# Altium PCB PCB2.PcbDoc (part 1 of 2)
Units mil, origin at the board's own origin, x right, y up, seen from the top; angles counter-clockwise.
Board outline 5000.03 x 3685 mil, 2 copper layers (Top Layer, Bottom Layer), stack 13.6 mil thick; 255 components, 133 nets, 710 pads, 295 vias.
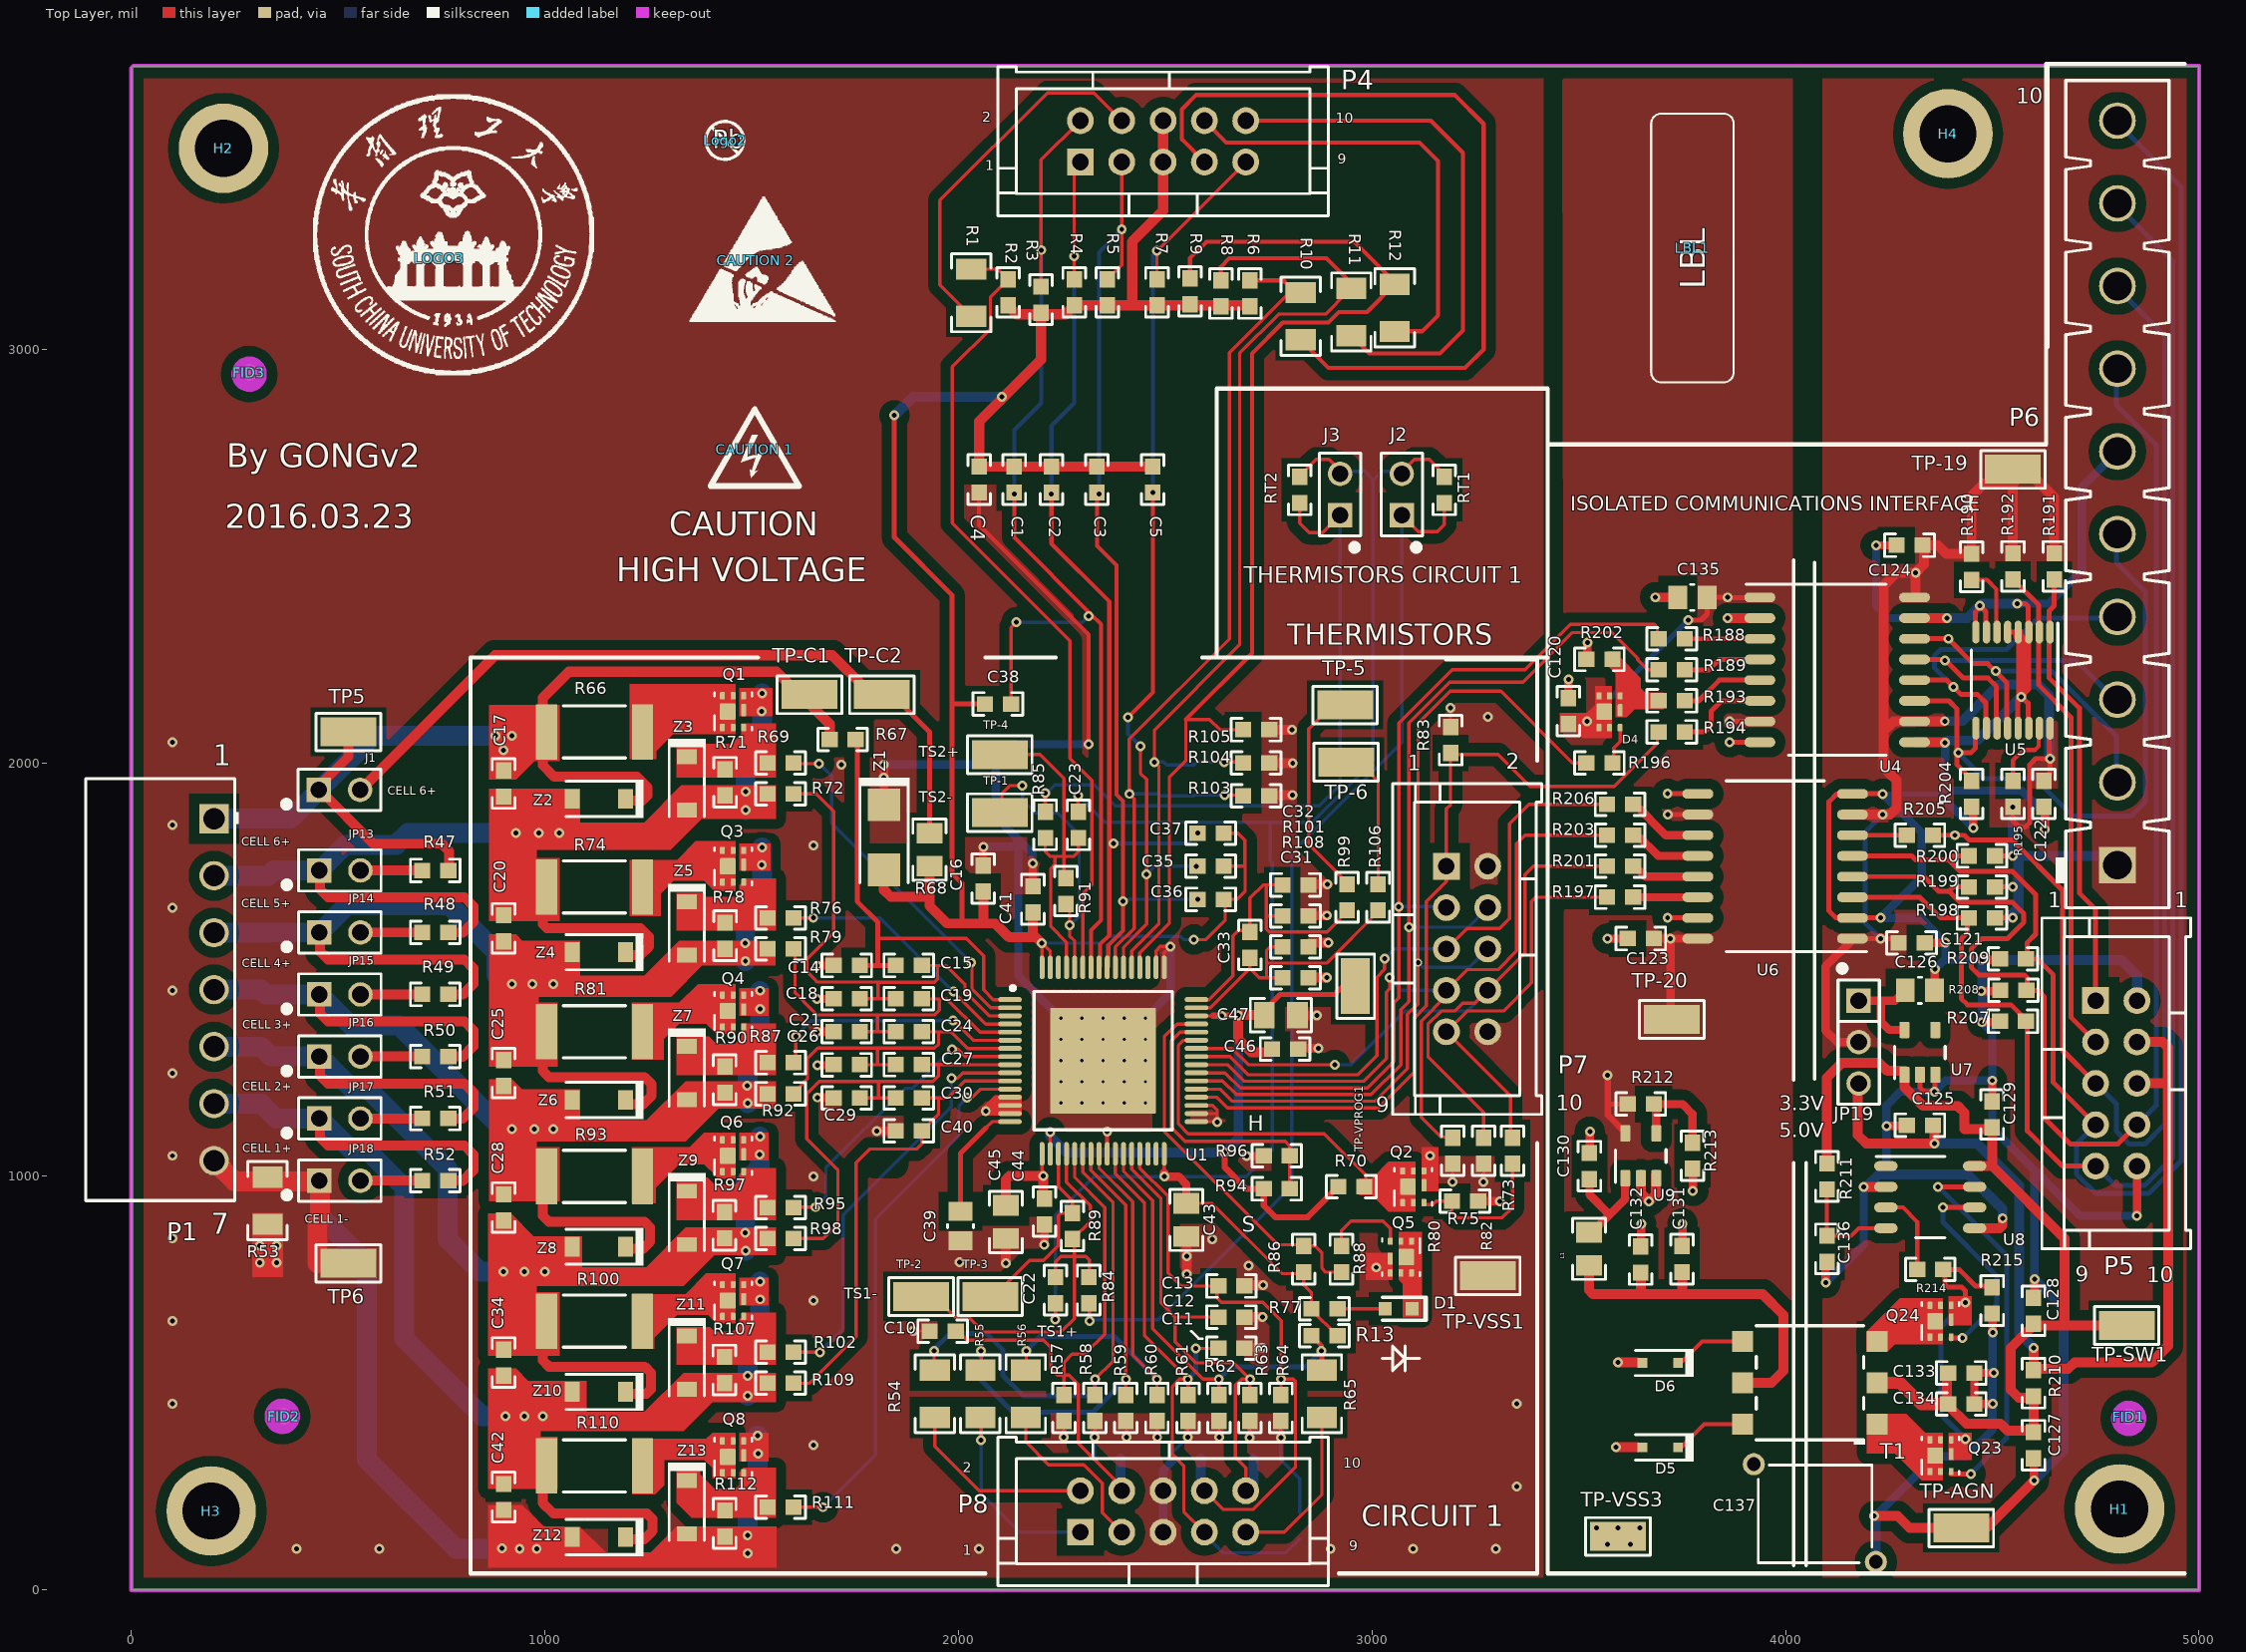
[diagram p0: Top Layer view]
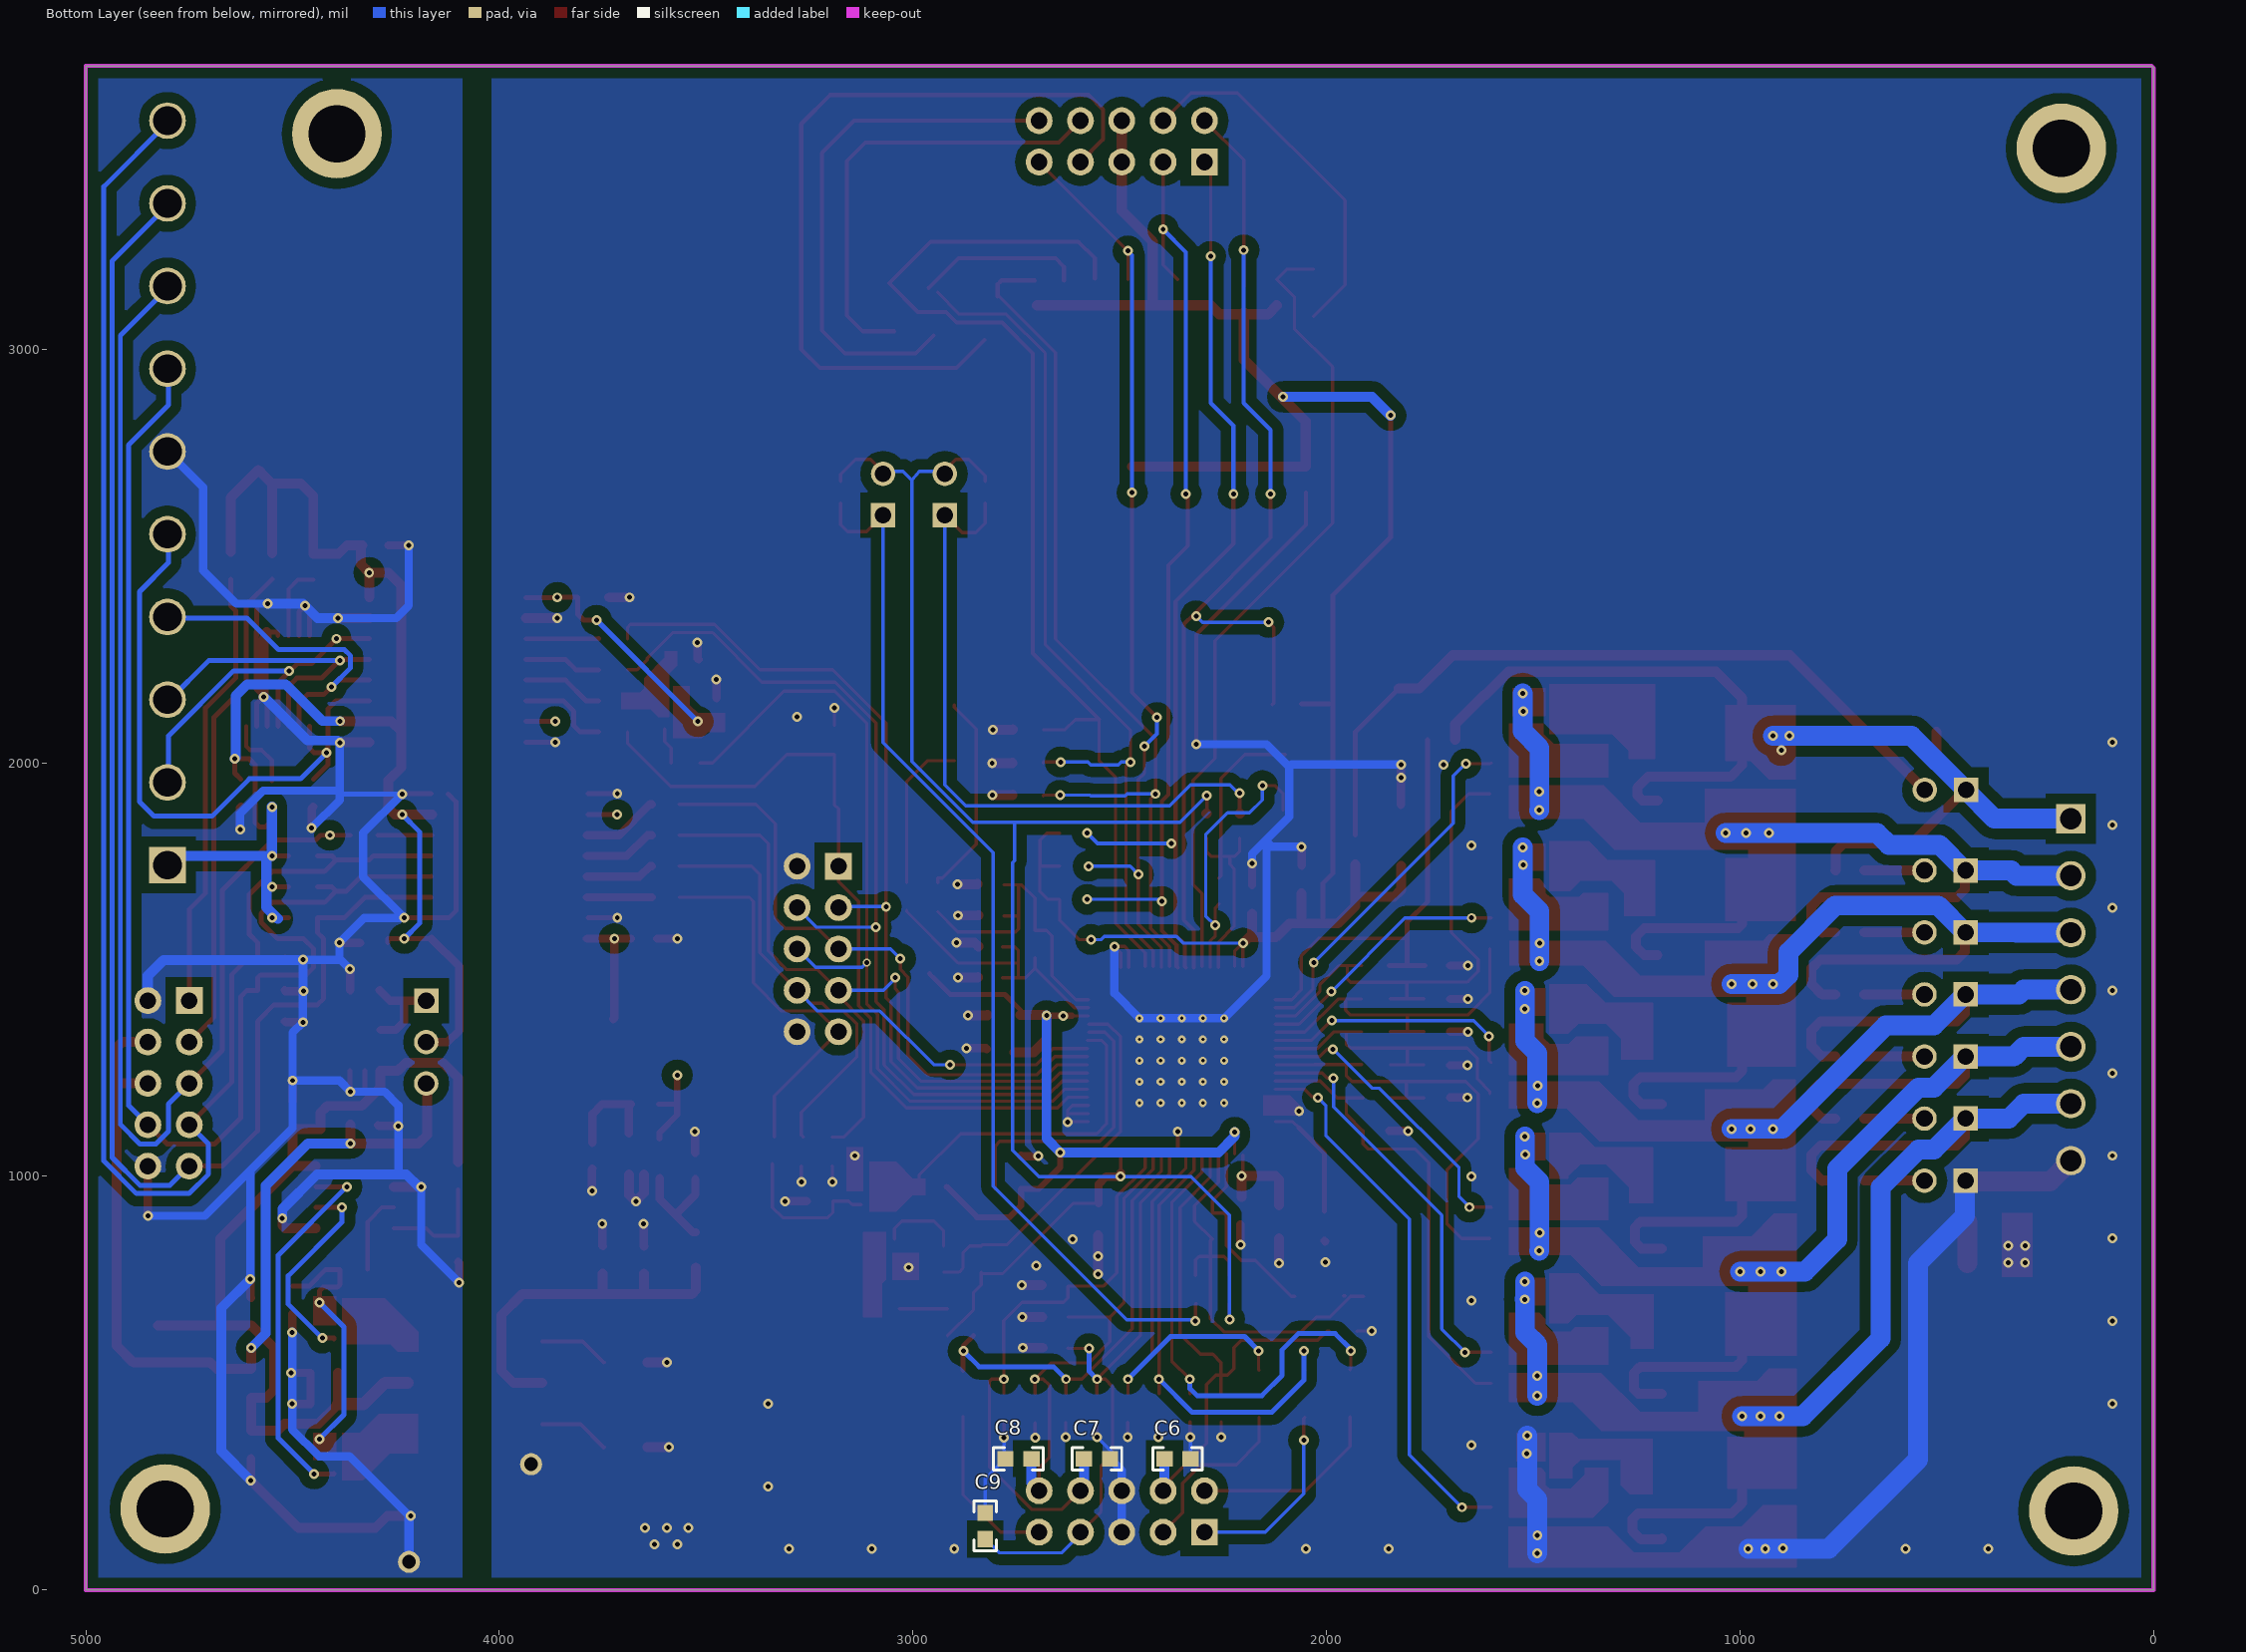
[diagram p1: Bottom Layer view, seen from below]

## Layer stack, top to bottom
Top Layer: signal copper 2.8
Dielectric: core 8, FR-4 High Tg, Dk 4.8
Bottom Layer: signal copper 2.8

## Board outline
0,0 0,3680 5,3685 5000,3685 5000,0.03 5000.03,0

## Design rules (kind name [scope] priority, off if disabled: settings)
Clearance [(InPolygon) vs (IsPad)] p1: gap=10
Clearance Clearance_1 [All] p2: gap=6
ComponentClearance [All] p1: gap=0 collisioncheckmode=3 verticalgap=-393.7 showdistances=FALSE
HoleSize [All] p1: absolutevalues=TRUE maxlimit=150 minlimit=1 maxpercent=80.000 minpercent=20.000
MinimumSolderMaskSliver [All] p1: minsoldermaskwidth=1
PlaneClearance [All] p1: clearance=15
PlaneConnect [All] p1: planeconnectstyle=Direct reliefexpansion=20 reliefentries=4 reliefconductorwidth=10 reliefairgap=10
PolygonConnect PolygonConnect_1 [All] p1: connectstyle=Direct reliefconductorwidth=10 reliefentries=4 polygonreliefangle="90 Angle"
PolygonConnect [All] p2: connectstyle=Direct reliefconductorwidth=10 reliefentries=4 polygonreliefangle="90 Angle"
RoutingVias [All] p1: holewidth=10 width=20 viastyle="Through Hole" minholewidth=5 minwidth=5 maxholewidth=100 maxwidth=100
SilkToSilkClearance [All] p1: silktosilkclearance=0
SilkscreenOverComponentPads [All] p1: minsilkscreentomaskgap=0
SolderMaskExpansion [All] p1: expansion=4
TestPointUsage [All] p1: valid=0 allowmultiple=FALSE
Testpoint [All] p1: side=15 testpointundercomponent=TRUE minsize=40 maxsize=100 preferedsize=60 minholesize=0 maxholesize=40 preferedholesize=32 testpointgrid=1 style=1023 order=0123456789
Width [All] p1: maxlimit=1968.5 minlimit=5 preferedwidth=10
17 further rules are at their usual default settings.

## Classes and differential pairs
component class Sheet5: C120 C121 C122 C123 C124 C125 C126 C127 C128 C129 C130 C131 C132 C133 C134 C135 C136 C137 D4 D5 D6 JP19 L1 Q23 Q24 R188 R189 R190 R191 R192 R193 R194 R195 R196 R197 R198 R199 R200 R201 R202 R203 R204 R205 R206 R207 R208 R209 R210 R211 R212 R213 R214 R215 T1 TP-19 TP-20 TP-AGN TP-SW1 TP-VSS3 U4 U5 U6 U7 U8 U9
component class Sheet2: C6 C7 C8 C9 C14 C15 C16 C17 C18 C19 C20 C21 C22 C23 C24 C25 C26 C27 C28 C29 C30 C31 C32 C33 C34 C35 C36 C37 C38 C39 C40 C41 C42 C43 C44 C45 C46 C47 D1 J1 J2 J3 Q1 Q2 Q3 Q4 Q5 Q6 Q7 Q8 R13 R66 R67 R68 R69 R70 R71 R72 R73 R74 R75 R76 R77 R78 R79 R80 R81 R82 R83 R84 R85 R86 R87 R88 R89 R90 R91 R92 R93 R94 R95 R96 R97 R98 R99 R100 R101 R102 R103 R104 R105 R106 R107 R108 R109 R110 R111 R112 RT1 RT2 TP-1 TP-2 TP-3 TP-4 TP-5 TP-6 TP-C1 TP-C2 TP-VPROG1 TP-VSS1 U1 Z1 Z2 Z3 Z4 Z5 Z6 Z7 Z8 Z9 Z10 Z11 Z12 Z13
component class Sheet_Hardware: "CAUTION 1" "CAUTION 2" FID1 FID2 FID3 H1 H2 H3 H4 LBL1 Logo2 LOGO3 SH-J1 SH-J2 SH-J3 SH-J4 SH-J5 SH-J6 SH-J7 SH-J8 SH-JP1 SH-JP3 SH-JP5 SH-JP7 SH-JP8 SH-JP9 SH-JP10 SH-JP11 SH-JP12 SH-JP19
component class Sheet1: C1 C2 C3 C4 C5 C10 C11 C12 C13 JP13 JP14 JP15 JP16 JP17 JP18 P1 P4 P5 P6 P7 P8 R1 R2 R3 R4 R5 R6 R7 R8 R9 R10 R11 R12 R47 R48 R49 R50 R51 R52 R53 R54 R55 R56 R57 R58 R59 R60 R61 R62 R63 R64 R65 TP5 TP6

## Components (designator, comment, footprint, x,y, rotation, side; value= is the part's Value field where it differs from the comment)
C1 "06035C104KAT2A" 0603[] 2135,2685 r270 top
C2 "06035C104KAT2A" 0603[] 2225,2685 r270 top
C3 "06035C104KAT2A" 0603[] 2335,2685 r270 top
C4 "06035C104KAT2A" 0603[] 2050,2685 r270 top
C5 "06035C104KAT2A" 0603[] 2470,2685 r270 top
C6 "GRM1885C1H330JA01D" 0603[] 2360,317.5 r180 bottom
C7 "GRM1885C1H330JA01D" 0603[] 2555,317.5 r180 bottom
C8 "GRM1885C1H330JA01D" 0603[] 2745,317.5 r0 bottom
C9 "GRM1885C1H330JA01D" 0603[] 2825,155 r90 bottom
C10 "06035C104KAT2A" 0603[] 1962,626 r180 top
C11 "06035C104KAT2A" 0603[] 2660,585 r0 top
C12 "06035C104KAT2A" 0603[] 2660,660 r0 top
C13 "06035C104KAT2A" 0603[] 2660,735 r0 top
C14 "06035C104KAT2A" 0603[] 1730,1510 r180 top
C15 "GRM188R72A104KA35D" 0603[] 1880,1510 r0 top
C16 "GRM188R72A104KA35D" 0603[] 2060,1720 r90 top
C17 "06035C104KAT2A" 0603[] 900,1950 r270 top
C18 "06035C104KAT2A" 0603[] 1730,1430 r180 top
C19 "GRM188R72A104KA35D" 0603[] 1880,1430 r0 top
C20 "06035C104KAT2A" 0603[] 900,1600 r270 top
C21 "06035C104KAT2A" 0603[] 1730,1350 r180 top
C22 "GRM188R71C473KA01D" 0603[] 2235,725 r90 top
C23 "GRM188R71C473KA01D" 0603[] 2290,1850 r270 top
C24 "GRM188R72A104KA35D" 0603[] 1880,1350 r0 top
C25 "06035C104KAT2A" 0603[] 900,1250 r270 top
C26 "06035C104KAT2A" 0603[] 1730,1270 r180 top
C27 "GRM188R72A104KA35D" 0603[] 1880,1270 r0 top
C28 "06035C104KAT2A" 0603[] 900,925 r270 top
C29 "06035C104KAT2A" 0603[] 1730,1190 r180 top
C30 "GRM188R72A104KA35D" 0603[] 1880,1190 r0 top
C31 "C0603C104K4RACTU" 0603[] 2815,1480 r0 top
C32 "C0603C104K4RACTU" 0603[] 2815,1705 r0 top
C33 "C0603C104K4RACTU" 0603[] 2705,1560 r270 top
C34 "GRM188R72A104KA35D" 0603[] 900,550 r270 top
C35 "GRM1885C1H330JA01D" 0603[] 2610,1750 r0 top
C36 "GRM1885C1H330JA01D" 0603[] 2610,1670 r0 top
C37 "GRM1885C1H330JA01D" 0603[] 2610,1830 r0 top
C38 "GRM1885C1H330JA01D" 0603[] 2095.67,2142.55 r180 top
C39 "C2012X7R1A106M125AC" 0805_145 2005,880 r270 top
C40 "06035C104KAT2A" 0603[] 1880,1110 r180 top
C41 "06035C104KAT2A" 0603[] 2180,1670 r90 top
C42 "06035C104KAT2A" 0603[] 900,225 r270 top
C43 "GRM21BR71A225KA01L" 0805_HV 2551,895 r270 top
C44 "06035C104KAT2A" 0603[] 2208,915 r270 top
C45 "GRM21BR71A225KA01L" 0805_HV 2115,890 r270 top
C46 "06035C104KAT2A" 0603[] 2790,1308 r0 top
C47 "GRM21BR71A225KA01L" 0805_HV 2780,1390 r0 top
C120 "06035C104KAT2A" 0603 3475,2125 r90 top
C121 "06035C104KAT2A" 0603 4305,1565 r0 top
C122 "06035C104KAT2A" 0603 4625,1925 r270 top
C123 "06035C104KAT2A" 0603 3650,1575 r180 top
C124 "06035C104KAT2A" 0603 4300,2526 r180 top
C125 "06035C104KAT2A" 0603 4325,1124 r180 top
C126 "C2012X7R1A106M125AC" 0805_145 4325,1450 r0 top
C127 "C1608X7R1C105K" 0603 4600,350 r270 top
C128 "C0603C475K8PACTU" 0603 4600,675 r90 top
C129 "06035C104KAT2A" 0603 4500,1150 r90 top
C130 "C0603C475K8PACTU" 0603 3526,1025 r90 top
C131 "C0603C475K8PACTU" 0603 3750,800 r90 top
C132 "06035C104KAT2A" 0603 3650,799 r90 top
C133 "06035C104KAT2A" 0603 4425,525 r0 top
C134 "C0603C475K8PACTU" 0603 4425,450 r0 top
C135 "C2012X7R1A106M125AC" 0805_145 3775,2400 r180 top
C136 "C0603C151J5GACTU" 0603 4100,825 r270 top
C137 "DEBE33F102ZC3B" CAPRD750W60D700H1000 4071,186 r180 top locked
"CAUTION 1" "DANGER HIGH VOLTAGE" IEC_HIGHVOLTAGE_SMALL 1507.7,2757.7 r0 top
"CAUTION 2" "DANGER HIGH VOLTAGE" jingdian 1510,3215 r0 top
D1 "APT1608SYCK" APT1608_YELLOW 3065,680 r0 top
D4 "CSD25310Q2" TRANS_NEXFET_Q2 3574.53,2123.54 r90 top
D5 "BAT54HT1G" SOD-323 3697,345 r180 top
D6 "BAT54HT1G" SOD-323 3697,549 r180 top
FID1 "Fiducial" Fiducial10-20 4830,415 r90 top
FID2 "Fiducial" FIDUCIAL10-20 365,420 r0 top
FID3 "Fiducial" Fiducial10-20 285,2940 r90 top
H1 "9030" Keystone_9030 4810,205 r0 top
H2 "9030" Keystone_9030 225,3495 r0 top
H3 "9030" Keystone_9030 195,200 r0 top
H4 "9030" Keystone_9030 4395,3530 r0 top
J1 "PEC02SAAN" CONN_PEC02SAAN 503,1935 r0 top
J2 "PEC02SAAN" CONN_PEC02SAAN 3072,2649 r90 top
J3 "PEC02SAAN" CONN_PEC02SAAN 2923,2649 r90 top
JP13 "PEC02SAAN" CONN_PEC02SAAN 504,1740 r0 top
JP14 "PEC02SAAN" CONN_PEC02SAAN 504,1590 r0 top
JP15 "PEC02SAAN" CONN_PEC02SAAN 504,1440 r0 top
JP16 "PEC02SAAN" CONN_PEC02SAAN 504,1290 r0 top
JP17 "PEC02SAAN" CONN_PEC02SAAN 504,1140 r0 top
JP18 "PEC02SAAN" CONN_PEC02SAAN 504,990 r0 top
JP19 "PEC03SAAN" CONN_PEC03SAAN 4177,1325 r270 top
L1 "LB2012T100KR" 0805_HV 3525,825 r90 top
LBL1 "Size: 0.65\" x 0.20 \"" Label_650x200 3775,3245 r90 top
Logo2 "Pb-Free Symbol" Pb-Free_Overlay_Small 1435,3505 r0 top
LOGO3 "SCUTlogo" SCUTlogo 745,3220 r0 top
P1 "395021007" MOLEX_395021007 200,1451.61 r270 top locked
P4 "5103308-1" CONN_5103308-1 2495,3502.75 r0 top
P5 "5103308-1" CONN_5103308-1 4800,1225 r270 top locked
P6 "HPM-10-05-T-S" SAMTEC_HPM-10-05-T-S 4802.59,2652.75 r90 top
P7 "5103308-1" CONN_5103308-1 3230,1550 r270 top locked
P8 "5103308-1" CONN_5103308-1 2495,190 r0 top locked
Q1 "CSD16301Q2" TRANS_NEXFET_Q2 1455,2124 r90 top
Q2 "CSD16301Q2" TRANS_NEXFET_Q2 3100,975 r90 top
Q3 "CSD16301Q2" TRANS_NEXFET_Q2 1455,1750 r90 top
Q4 "CSD16301Q2" TRANS_NEXFET_Q2 1455,1400 r90 top
Q5 "CSD16301Q2" TRANS_NEXFET_Q2 3070,805 r270 top
Q6 "CSD16301Q2" TRANS_NEXFET_Q2 1455,1050 r90 top
Q7 "CSD16301Q2" TRANS_NEXFET_Q2 1455,700 r90 top
Q8 "CSD16301Q2" TRANS_NEXFET_Q2 1455,322 r90 top
Q23 "CSD16301Q2" TRANS_NEXFET_Q2 4375,325 r90 top
Q24 "CSD16301Q2" TRANS_NEXFET_Q2 4375,650 r90 top
R1 "CRCW12061K00FKEA" 1206[] 2031,3136.75 r270 top
R2 "CRCW06030000Z0EA" 0603[] 2120,3137.75 r270 top
R3 "CRCW06030000Z0EA" 0603[] 2200,3120 r270 top
R4 "CRCW06030000Z0EA" 0603[] 2280,3137.75 r270 top
R5 "CRCW06030000Z0EA" 0603[] 2360,3137.75 r270 top
R6 "CRCW06030000Z0EA" 0603[] 2705,3135 r270 top
R7 "CRCW06030000Z0EA" 0603[] 2480,3137.75 r270 top
R8 "CRCW06030000Z0EA" 0603[] 2635,3135 r270 top
R9 "CRCW06030000Z0EA" 0603[] 2560,3140 r270 top
R10 "CRCW12061K00FKEA" 1206[] 2827.91,3080 r270 top
R11 "CRCW12061K00FKEA" 1206[] 2950,3090 r270 top
R12 "CRCW12061K00FKEA" 1206[] 3055,3100 r270 top
R13 "CRCW06030000Z0EA" 0603[] 2885,615 r0 top
R47 "CRCW06031K00JNEA" 0603[] 735,1740 r0 top
R48 "CRCW06031K00JNEA" 0603[] 735,1590 r0 top
R49 "CRCW06031K00JNEA" 0603[] 735,1440 r0 top
R50 "CRCW06031K00JNEA" 0603[] 735,1290 r0 top
R51 "CRCW06031K00JNEA" 0603[] 735,1140 r0 top
R52 "CRCW06031K00JNEA" 0603[] 735,990 r0 top
R53 "CRCW12060000Z0EA" 1206[] 329.46,941.2 r90 top
R54 "CRCW12061K00FKEA" 1206[] 1943,474.49 r90 top
R55 "CRCW12061K00FKEA" 1206[] 2053,474.49 r90 top
R56 "CRCW12061K00FKEA" 1206[] 2163,474.49 r90 top
R57 "CRCW06031K00JNEA" 0603[] 2255,440 r90 top
R58 "CRCW06031K00JNEA" 0603[] 2330,440 r90 top
R59 "CRCW06031K00JNEA" 0603[] 2405,440 r90 top
R60 "CRCW06031K00JNEA" 0603[] 2480,440 r90 top
R61 "CRCW06031K00JNEA" 0603[] 2555,440 r90 top
R62 "CRCW06031K00JNEA" 0603[] 2630,440 r90 top
R63 "CRCW06031K00JNEA" 0603[] 2705,440 r90 top
R64 "CRCW06031K00JNEA" 0603[] 2780,440 r90 top
R65 "CRCW12061K00FKEA" 1206[] 2879,474.49 r90 top
R66 "CRCW251247R0JNEG" 2512 1120,2075 r180 top
R67 "RG1608P-102-B-T5" 0603[] 1720.02,2056.75 r180 top
R68 "CRCW08050000Z0EA" 0805_HV 1930,1790 r270 top
R69 "RG1608P-102-B-T5" 0603[] 1570,2000 r180 top
R70 "ERJ-3EKF1002V" 0603[] 2950,975 r180 top
R71 "CRCW06031M00JNEA" 0603[] 1436,1953 r90 top
R72 "RG1608P-102-B-T5" 0603[] 1570,1925 r0 top
R73 "RG1608P-102-B-T5" 0603[] 3340,1062 r270 top
R74 "CRCW251247R0JNEG" 2512 1120,1700 r180 top
R75 "ERJ-3EKF1002V" 0603[] 3225,940 r180 top
R76 "RG1608P-102-B-T5" 0603[] 1570,1625 r180 top
R77 "CRCW06031K60JNEA" 0603[] 2885,680 r180 top
R78 "CRCW06031M00JNEA" 0603[] 1436,1582 r90 top
R79 "RG1608P-102-B-T5" 0603[] 1570,1550 r0 top
R80 "ERJ-3EKF1002V" 0603[] 3195,1062 r270 top
R81 "CRCW251247R0JNEG" 2512 1120,1350 r180 top
R82 "ERJ-3EKF1002V" 0603[] 3270,1062 r270 top
R83 "ERJ-3EKF1002V" 0603[] 3190,2055 r90 top
R84 "CRCW06031K47FKEA" 0603[] 2315,725 r270 top
R85 "CRCW06031K47FKEA" 0603[] 2210,1850 r90 top
R86 "CRCW0603100KFKEA" 0603[] 2835,800 r270 top
R87 "RG1608P-102-B-T5" 0603[] 1570,1275 r180 top
R88 "CRCW0603100RJNEA" 0603[] 2926,800 r270 top
R89 "CRCW06031K82FKEA" 0603[] 2276,880 r270 top
R90 "CRCW06031M00JNEA" 0603[] 1435,1234 r90 top
R91 "CRCW06031K82FKEA" 0603[] 2260,1690 r90 top
R92 "RG1608P-102-B-T5" 0603[] 1570,1200 r0 top
R93 "CRCW251247R0JNEG" 2512 1120,1000 r180 top
R94 "CRCW06030000Z0EA" 0603[] 2770,970 r180 top
R95 "RG1608P-102-B-T5" 0603[] 1570,925 r180 top
R96 "CRCW06030000Z0EA" 0603[] 2770,1050 r0 top
R97 "CRCW06031M00JNEA" 0603[] 1434,882 r90 top
R98 "RG1608P-102-B-T5" 0603[] 1570,850 r0 top
R99 "CRCW06030000Z0EA" 0603[] 2940,1675 r90 top
R100 "CRCW251247R0JNEG" 2512 1120,650 r180 top
R101 "CRCW06030000Z0EA" 0603[] 2815,1630 r0 top
R102 "RG1608P-102-B-T5" 0603[] 1570,575 r180 top
R103 "CRCW06030000Z0EA" 0603[] 2720,1920 r180 top
R104 "CRCW06030000Z0EA" 0603[] 2720,2000 r180 top
R105 "CRCW06030000Z0EA" 0603[] 2720,2080 r180 top
R106 "CRCW06030000Z0EA" 0603[] 3015,1675 r90 top
R107 "CRCW06031M00JNEA" 0603[] 1434,532 r90 top
R108 "CRCW06030000Z0EA" 0603[] 2815,1555 r0 top
R109 "RG1608P-102-B-T5" 0603[] 1570,500 r0 top
R110 "CRCW251247R0JNEG" 2512 1120,300 r180 top
R111 "RG1608P-102-B-T5" 0603[] 1570,200 r180 top
R112 "CRCW06031M00JNEA" 0603[] 1435,161 r90 top
R188 "CRCW0603100RJNEA" 0603 3725,2300 r0 top
R189 "CRCW0603100RJNEA" 0603 3725,2225 r0 top
R190 "CRCW06031M00JNEA" 0603 4450,2474 r90 top
R191 "CRCW06031M00JNEA" 0603 4650,2475 r90 top
R192 "CRCW06031M00JNEA" 0603 4550,2475 r90 top
R193 "CRCW0603100RJNEA" 0603 3725,2150 r0 top
R194 "CRCW0603100RJNEA" 0603 3725,2075 r0 top
R195 "CRCW06031M00JNEA" 0603 4550,1925 r270 top
R196 "ERJ-3EKF1002V" 0603 3550,2000 r0 top
R197 "CRCW0603100RJNEA" 0603 3600,1675 r180 top
R198 "CRCW06030000Z0EA" 0603 4475,1625 r0 top
R199 "CRCW06030000Z0EA" 0603 4475,1700 r0 top
R200 "CRCW06030000Z0EA" 0603 4475,1775 r0 top
R201 "CRCW0603100RJNEA" 0603 3600,1750 r180 top
R202 "RG1608P-102-B-T5" 0603 3550,2250 r0 top
R203 "CRCW0603100RJNEA" 0603 3600,1825 r180 top
R204 "CRCW0603100KFKEA" 0603 4450,1925 r90 top
R205 "CRCW0603100RJNEA" 0603 4325,1825 r180 top
R206 "CRCW0603100RJNEA" 0603 3600,1900 r180 top
R207 "ERJ-3EKF1002V" 0603 4550,1375 r0 top
R208 "ERJ-3EKF1002V" 0603 4551,1450 r0 top
R209 "ERJ-3EKF1002V" 0603 4550,1526 r0 top
R210 "RC0603FR-072RL" 0603 4600,500 r270 top
R211 "ERJ-3EKF1002V" 0603 4100,1000 r270 top
R212 "RC0603FR-07523KL" 0603 3650,1175 r0 top
R213 "RC0603FR-07169KL" 0603 3775,1050 r90 top
R214 "RG1608P-102-B-T5" 0603 4350,775 r0 top
R215 "CRCW06031R00JNEA" 0603 4500,700 r90 top
RT1 "ERT-J1VG103FA" 0603[] 3175,2660 r90 top
RT2 "ERT-J1VG103FA" 0603[] 2825,2660 r90 top
T1 "Transformer, 400 uH, SMT" COILCRAFT_Q4470-CL 4059,501 r180 top
TP5 "5015" TESTPOINT_KEYSTONE_MINIATURE 525,2075 r0 top
TP6 "5015" TESTPOINT_KEYSTONE_MINIATURE 525,790 r0 top
TP-1 "5015" TESTPOINT_KEYSTONE_MINIATURE 2100,1880 r0 top
TP-2 "5015" TESTPOINT_KEYSTONE_MINIATURE 1910,710 r0 top
TP-3 "5015" TESTPOINT_KEYSTONE_MINIATURE 2077,710 r0 top
TP-4 "5015" TESTPOINT_KEYSTONE_MINIATURE 2100,2020 r0 top
TP-5 "5015" TESTPOINT_KEYSTONE_MINIATURE 2935,2140 r0 top
TP-6 "5015" TESTPOINT_KEYSTONE_MINIATURE 2937.44,2002.02 r0 top
TP-19 "5015" TESTPOINT_KEYSTONE_MINIATURE 4550,2710 r0 top
TP-20 "5020" TESTPOINT_KEYSTONE_MINIATURE 3725,1380 r0 top
TP-AGN "5015" TESTPOINT_KEYSTONE_MINIATURE 4425,150 r0 top
TP-C1 "5015" TESTPOINT_KEYSTONE_MINIATURE 1640,2165 r0 top
TP-C2 "5015" TESTPOINT_KEYSTONE_MINIATURE 1815,2165 r0 top
TP-SW1 "5015" TESTPOINT_KEYSTONE_MINIATURE 4825,640 r0 top
TP-VPROG1 "5015" TESTPOINT_KEYSTONE_MINIATURE 2960,1460 r90 top
TP-VSS1 "5015" TESTPOINT_KEYSTONE_MINIATURE 3280,760 r0 top
TP-VSS3 "5015" TESTPOINT_KEYSTONE_MINIATURE 3595,130 r0 top
U1 "BQ76PL536ATPAPRQ1" PAP0064F_N 2350,1280 r0 top locked
U4 "ISO7241CDW" DW0016A_N 4125,2225 r0 top locked
U5 "PCA9557PWR" PW0016A_N 4550,2200 r270 top locked
U6 "ISO7241CDW" DW0016A_N 3975,1750 r180 top locked
U7 "TPS76933DBVR" DBV0005A_N 4325,1300 r90 top
U8 "UCC2808DTR-2" D0008A_N 4350,950 r0 top
U9 "TPS76901DBV" DBV0005A_N 3650,1050 r90 top
Z1 "SMAJ36CA" SMA 1820,1820 r270 top
Z2 "MMSZ5232B-7-F" SOD-123 1131,1913 r180 top
Z3 "MMSZ5232B-7-F" SOD-123 1343,1950 r270 top
Z4 "MMSZ5232B-7-F" SOD-123 1131,1542 r180 top
Z5 "MMSZ5232B-7-F" SOD-123 1343,1600 r270 top
Z6 "MMSZ5232B-7-F" SOD-123 1131,1185 r180 top
Z7 "MMSZ5232B-7-F" SOD-123 1343,1250 r270 top
Z8 "MMSZ5232B-7-F" SOD-123 1131,830 r180 top
Z9 "MMSZ5232B-7-F" SOD-123 1343,900 r270 top
Z10 "MMSZ5232B-7-F" SOD-123 1131,479 r180 top
Z11 "MMSZ5232B-7-F" SOD-123 1343,550 r270 top
Z12 "MMSZ5232B-7-F" SOD-123 1131,128 r180 top
Z13 "MMSZ5232B-7-F" SOD-123 1343,200 r270 top

## Footprints (in the part's own frame and the unit in brackets; to place one, negate y for a bottom-side part, rotate by r counter-clockwise, add the part's x,y. Pads: shape width x height; smd on the part's side, far side on the other; paste and mask are expansions set on the pad)
0603 [mm] "0603 from SM-752 data"
  rect 1x0.95 smd: 1(-0.8,0) 2(0.8,0)
  silkscreen extent -1.52,-0.69 1.52,0.69, body extent -0.87,-0.47 0.87,0.47, height 0.85
0603[] [mm] "0603 from SM-752 data"
  rect 1x0.95 smd: 1(-0.8,0) 2(0.8,0)
  silkscreen extent -1.52,-0.69 1.52,0.69, body extent -0.87,-0.47 0.87,0.47, height 0.85
0805_145 [mm] "0805 / 1.45mm height"
  rect 1.15x1.45 smd: 1(-0.9,0) 2(0.9,0)
  silkscreen extent -0.1,-0.8 0.1,0.8, body extent -1.1,-0.72 1.1,0.72, height 1.45
0805_HV [mil] "0805 with 30mil clearance between pads"
  rect 50x63 smd: 1(-40,0) 2(40,0)
  silkscreen extent -74,-40 74,40, body extent -43,-29 43,29, height 57
1206[] [mm] "1206 from SM-752 data"
  rect 1.3x1.85 smd: 1(-1.45,0) 2(1.45,0)
  silkscreen extent -2.4,-1.21 2.4,1.21, body extent -1.7,-0.9 1.7,0.9, height 1.35
2512 [mm] "Chip Resistor, Body 6.3x3.2mm, IPC Medium Density"
  rect 1.3x3.4 smd: 1(-2.95,0) 2(2.95,0)
  silkscreen extent -1.9,-1.6 1.9,1.6, body extent -3.22,-1.67 3.22,1.67, height 0.71
APT1608_YELLOW [mm] "SMD, 2-Leads, Body 0.8x1.6mm"
  rect 0.8x0.8 smd: 1(-0.825,0) 2(0.825,0)
  silkscreen extent -1,-0.7 1.8,0.7, body extent -0.8,-0.4 0.81,0.4, height 0.76
CAPRD750W60D700H1000 [mm] "muRata"
  round 1.35 hole 0.85: 1(-3.75,3) 2(3.75,-3)
  silkscreen extent -3.5,-2.95 3.47,3.05, body extent -4.26,-3.51 4.26,3.51, height 9.97
COILCRAFT_Q4470-CL [mm] "SMD, 6-Leads, Body 6.6x6.99mm, Pitch 2.54mm"
  rect 1.27x1.27 smd: 1(-4.13,2.54) 2(-4.13,0) 3(-4.13,-2.54) 4(4.13,-2.54) 5(4.13,0) 6(4.13,2.54)
  silkscreen extent -3.4,-3.5 3.3,3.8, body extent -4.25,-3.49 4.25,3.5, height 5.46
CONN_5103308-1 [mm] "TE Connectivity (AMP) Rev E datasheet"
  rect 1.65x1.65 hole 1.016: 1(-5.08,-1.27)
  round 1.65 hole 1.016: 2(-5.08,1.27) 3(-2.54,-1.27) 4(-2.54,1.27) 5(0,-1.27) 6(0,1.27) 7(2.54,-1.27) 8(2.54,1.27) 9(5.08,-1.27) 10(5.08,1.27)
  silkscreen extent -10.16,-4.57 10.16,4.57, body extent -10.16,-4.57 10.16,4.57, height 9.87
CONN_PEC02SAAN [mm] "SULLINS"
  rect 1.5x1.5 hole 1.016: 1(-1.27,0)
  round 1.5 hole 1.016: 2(1.27,0)
  silkscreen extent -3.45,-1.27 2.54,1.27, body extent -2.54,-1.27 2.54,1.27, height 8.38
CONN_PEC03SAAN [mm] "SULLINS"
  rect 1.5x1.5 hole 1.016: 1(-2.54,0)
  round 1.5 hole 1.016: 2(0,0) 3(2.54,0)
  silkscreen extent -4.72,-1.27 3.81,1.27, body extent -3.84,-1.3 3.84,1.3, height 8.38
D0008A_N [mm] "SOIC, 8-Leads, Body 4.9x3.9mm, Pitch 1.27mm, IPC Medium Density"
  oval 1.45x0.6 smd: 1(-2.725,1.905) 2(-2.725,0.635) 3(-2.725,-0.635) 4(-2.725,-1.905) 5(2.725,-1.905) 6(2.725,-0.635) 7(2.725,0.635) 8(2.725,1.905)
  silkscreen extent -3.3,-2.5 0.9,2.5, body extent -3,-2.45 3,2.45, height 1.63
DBV0005A_N [mm] "SOT23, 5-Leads, Body 2.9x1.6mm, Pitch 0.95mm, Lead Span 2.8mm, IPC Medium Density"
  rrect17% 1x0.6 smd: 1(-1.375,0.95) 2(-1.375,0) 3(-1.375,-0.95) 4(1.375,-0.95) 5(1.375,0.95)
  silkscreen extent -1.63,-1.55 0.38,1.55, body extent -1.42,-1.46 1.42,1.46, height 1.09
DW0016A_N [mm] "SOIC, 16-Leads, Body 10.3x7.5mm, Pitch 1.27mm, IPC Medium Density"
  oval 1.9x0.6 smd: 1(-4.75,4.445) 2(-4.75,3.175) 3(-4.75,1.905) 4(-4.75,0.635) 5(-4.75,-0.635) 6(-4.75,-1.905) 7(-4.75,-3.175) 8(-4.75,-4.445) 9(4.75,-4.445) 10(4.75,-3.175) 11(4.75,-1.905) 12(4.75,-0.635) 13(4.75,0.635) 14(4.75,1.905) 15(4.75,3.175) 16(4.75,4.445)
  silkscreen extent -5.6,-5.25 3,5.25, body extent -5.14,-5.13 5.14,5.13, height 2.54
Fiducial10-20 [mm]
  round 1 smd: 1(0.102,0)
  Top Layer keep-out circle w1.178: c0,0 r0.5
FIDUCIAL10-20 [mm]
  round 1 smd: 1(0.102,0)
  Top Layer keep-out circle w1.178: c0,0 r0.5
IEC_HIGHVOLTAGE_SMALL [mil]
  silkscreen extent -107,-88 107,97
jingdian [mil]
  silkscreen extent -160,-147 194,155
Keystone_9030 [mm] "BRD SPT SNAP LOCK SCREW MNT 3/8\""
  round 5.5 hole 3.5: 1(-0.051,-0.229)
Label_650x200 [mil] "Thermal Transfer Label"
  round 1 on Mech13: 0(0,0)
  silkscreen extent -325,-100 325,100, body extent -326,-101 326,101, height 1
MOLEX_395021007 [mm] "Header(Shrouded), 3.5mm, 7x1,  R/A, TH"
  rect 1.8x1.8 hole 1.3: 1(-10.5,0)
  round 1.8 hole 1.3: 2(-7,0) 3(-3.5,0) 4(0,0) 5(3.5,0) 6(7,0) 7(10.5,0)
  silkscreen extent -12.95,-7.87 12.95,1.52, body extent -12.95,-7.87 12.95,1.27, height 6.86
PAP0064F_N [mm] "Thin QFP, 64-Leads, Body 10x10mm, Pitch 0.5mm, Thermal Pad 6.5x6.5mm, IPC Medium Density"
  rrect100% 1.45x0.3 smd: 1(-5.725,3.75) 2(-5.725,3.25) 3(-5.725,2.75) 4(-5.725,2.25) 5(-5.725,1.75) 6(-5.725,1.25) 7(-5.725,0.75) 8(-5.725,0.25) 9(-5.725,-0.25) 10(-5.725,-0.75) 11(-5.725,-1.25) 12(-5.725,-1.75) 13(-5.725,-2.25) 14(-5.725,-2.75) 15(-5.725,-3.25) 16(-5.725,-3.75) 33(5.725,-3.75) 34(5.725,-3.25) 35(5.725,-2.75) 36(5.725,-2.25) 37(5.725,-1.75) 38(5.725,-1.25) 39(5.725,-0.75) 40(5.725,-0.25) 41(5.725,0.25) 42(5.725,0.75) 43(5.725,1.25) 44(5.725,1.75) 45(5.725,2.25) 46(5.725,2.75) 47(5.725,3.25) 48(5.725,3.75)
  rrect100% 0.3x1.45 smd: 17(-3.75,-5.725) 18(-3.25,-5.725) 19(-2.75,-5.725) 20(-2.25,-5.725) 21(-1.75,-5.725) 22(-1.25,-5.725) 23(-0.75,-5.725) 24(-0.25,-5.725) 25(0.25,-5.725) 26(0.75,-5.725) 27(1.25,-5.725) 28(1.75,-5.725) 29(2.25,-5.725) 30(2.75,-5.725) 31(3.25,-5.725) 32(3.75,-5.725) 49(3.75,5.725) 50(3.25,5.725) 51(2.75,5.725) 52(2.25,5.725) 53(1.75,5.725) 54(1.25,5.725) 55(0.75,5.725) 56(0.25,5.725) 57(-0.25,5.725) 58(-0.75,5.725) 59(-1.25,5.725) 60(-1.75,5.725) 61(-2.25,5.725) 62(-2.75,5.725) 63(-3.25,5.725) 64(-3.75,5.725)
  rrect2% 6.5x6.5 smd: 65(0,0)
  silkscreen extent -5.67,-4.25 4.25,4.57, body extent -6.01,-6.01 6.01,6.01, height 1.2
Pb-Free_Overlay_Small [mil]
  silkscreen extent -46,-46 46,46
PW0016A_N [mm] "TSOP, 16-Leads, Body 5x4.4mm, Pitch 0.65mm, IPC Medium Density"
  oval 1.4x0.45 smd: 1(-2.95,2.275) 2(-2.95,1.625) 3(-2.95,0.975) 4(-2.95,0.325) 5(-2.95,-0.325) 6(-2.95,-0.975) 7(-2.95,-1.625) 8(-2.95,-2.275) 9(2.95,-2.275) 10(2.95,-1.625) 11(2.95,-0.975) 12(2.95,-0.325) 13(2.95,0.325) 14(2.95,0.975) 15(2.95,1.625) 16(2.95,2.275)
  silkscreen extent -3.5,-2.55 1.85,2.75, body extent -3.21,-2.5 3.21,2.5, height 1
SAMTEC_HPM-10-05-T-S [mm] "Header, 5.08mm, 10x1, TH"
  rect 2.25x2.25 hole 1.75: 1(-22.86,0)
  round 2.25 hole 1.75: 2(-17.78,0) 3(-12.7,0) 4(-7.62,0) 5(-2.54,0) 6(2.54,0) 7(7.62,0) 8(12.7,0) 9(17.78,0) 10(22.86,0)
  silkscreen extent -25.47,-3.17 25.33,3.8, body extent -25.47,-3.17 25.33,3.18, height 7.15
SCUTlogo [mil]
  silkscreen extent -305,-281 373,396
SMA [mm] "Molded Diode, 2-Leads, Body 4.3x2.6mm, IPC Medium Density, based on OnSemi component dimensions and land pattern"
  rect 2x2 smd: 1(-2,0) 2(2,0)
  silkscreen extent -3.66,-1.57 2.79,1.57, body extent -2.6,-1.3 2.6,1.3, height 2.42
SOD-123 [mm] "On Semi recommended land pattern"
  rect 0.915x1.22 smd: 1(-1.637,0) 2(1.637,0)
  silkscreen extent -2.74,-1.17 2.03,1.17, body extent -1.93,-0.9 1.93,0.9, height 1.35
SOD-323 [mm] "NXP recommended land pattern"
  rect 0.6x0.6 smd: 1(-1.1,0) 2(1.1,0)
  silkscreen extent -2.06,-0.86 1.53,0.86, body extent -1.3,-0.67 1.3,0.68, height 1.1
TESTPOINT_KEYSTONE_MINIATURE [mil] "Miniature SMT test point"
  rect 135x70 smd: 1(0,0)
  silkscreen extent -78,-46 78,45, body extent -52,-20 52,20, height 61
TRANS_NEXFET_Q2 [mm] "TI recommended land pattern M0167-01"
  rrect33% 0.45x0.3 smd: 1(-0.975,0.65) 2(-0.975,0) 3(-0.975,-0.65) 4(0.975,-0.65) 5(0.975,0) 6(0.975,0.65)
  rrect33% 0.75x0.3 smd: 7(0.095,-0.65)
  rrect11% 1x0.95 smd: 8(0,0.325)
  body extent -1,-1 1,1, height 0.85

## Part data
C1 C2 C3 C4 C5 C10 C11 C12 C13 C120 C121 C122 C123 C124 C125 C129 C132 C133: "CAP, CERM, 0.1 µF, 50 V, +/- 10%, X7R, 0603"
C6 C7 C8 C9 C35 C36 C37 C38: "CAP, CERM, 33 pF, 50 V, +/- 5%, C0G/NP0, 0603"
C14 C17 C18 C20 C21 C25 C26 C28 C29 C40 C41 C42 C44 C46: "CAP, CERM, 0.1uf, 50 V, +/- 10%, X7R, 0603"
C15 C16 C19 C24 C27 C30 C34: "CAP, CERM, 0.1uf, 100 V, +/- 10%, X7R, 0603"
C22 C23: "CAP, CERM, 0.047 µF, 16 V, +/- 10%, X7R, 0603"
C31 C32 C33: "CAP, CERM, 0.1 µF, 16 V, +/- 10%, X7R, 0603"
C39 C126 C135: "CAP, CERM, 10 µF, 10 V, +/- 20%, X7R, 0805"
C43 C45 C47: "CAP, CERM, 2.2 µF, 10 V, +/- 10%, X7R, 0805"
C127: "CAP, CERM, 1 µF, 16 V, +/- 10%, X7R, 0603"
C128 C130 C131 C134: "CAP, CERM, 4.7 µF, 10 V, +/- 10%, X5R, 0603"
C136: "CAP, CERM, 150 pF, 50 V, +/- 5%, C0G/NP0, 0603"
C137: "CAP, CERM, 1000 pF, 3150 V, +80/-20%, E, Radial Disc D7x6mm"
"CAUTION 1" "CAUTION 2": library part IEC_HighVoltage, "IEC 61010-1 High Voltage Warning"
D1: "LED, Yellow, SMD"
D4: "MOSFET, P-CH, -20 V, -20 A, SON 2x2mm"
D5 D6: "Diode, Schottky, 30 V, 0.2 A, SOD-323"
FID1 FID2 FID3: "Fiducial mark.  There is nothing to buy or mount."
H1 H2 H3 H4: "BRD SPT SNAP LOCK SCREW MNT 3/8\""
J1 J2 J3 JP13 JP14 JP15 JP16 JP17 JP18: "Header, 100mil, 2x1, Tin, TH"
JP19: "Header, 100mil, 3x1, Tin, TH"
L1: "Inductor, Wirewound, Ferrite, 10uH, 0.12A, 0.5 ohm, SMD"
LBL1: library part THT-14-423-10, "Thermal Transfer Printable Labels, 0.650\" W x 0.200\" H - 10,000 per roll"
Logo2: library part Pb-Free
P1: "Header(Shrouded), 3.5mm, 7x1,  R/A, TH"
P4 P5 P7 P8: "Header (shrouded), 100mil, 5x2, Gold, TH"
P6: "Header, 5.08mm, 10x1, Tin, TH"
Q1 Q2 Q3 Q4 Q5 Q6 Q7 Q8 Q23 Q24: "MOSFET, N-CH, 25 V, 5 A, SON 2x2mm"
R1 R10 R11 R12 R54 R55 R56 R65: library part CRCW06031K00JNEA, "RES, 1.00 k, 1%, 0.25 W, 1206"
R2 R3 R4 R5 R6 R7 R8 R9 R13 R94 R96 R99 R101 R103 R104 R105 R106 R108 R198 R199 R200: "RES, 0, 5%, 0.1 W, 0603"
R47 R48 R49 R50 R51 R52 R57 R58 R59 R60 R61 R62 R63 R64: "RES, 1.0 k, 5%, 0.1 W, 0603"
R53: "RES, 0, 5%, 0.25 W, 1206"
R66 R74 R81 R93 R100 R110: "RES, 47, 5%, 1 W, 2512"
R67 R69 R72 R73 R76 R79 R87 R92 R95 R98 R102 R109 R111 R202 R214: "RES, 1.00 k, 0.1%, 0.1 W, 0603"
R68: "RES, 0, 5%, 0.125 W, 0805"
R70 R75 R80 R82 R83 R196 R207 R208 R209 R211: "RES, 10.0 k, 1%, 0.1 W, 0603"
R71 R78 R90 R97 R107 R112 R190 R191 R192 R195: "RES, 1.0 M, 5%, 0.1 W, 0603"
R77: "RES, 1.6 k, 5%, 0.1 W, 0603"
R84 R85: "RES, 1.47 k, 1%, 0.1 W, 0603"
R86 R204: "RES, 100 k, 1%, 0.1 W, 0603"
R88 R188 R189 R193 R194 R197 R201 R203 R205 R206: "RES, 100, 5%, 0.1 W, 0603"
R89 R91: "RES, 1.82 k, 1%, 0.1 W, 0603"
R210: "RES, 2.00, 1%, 0.1 W, 0603"
R212: "RES, 523 k, 1%, 0.1 W, 0603"
R213: "RES, 169 k, 1%, 0.1 W, 0603"
R215: "RES, 1.0, 5%, 0.1 W, 0603"
RT1 RT2: "Thermistor NTC, 10.0k ohm, 1%, 0603"
T1: library part Q4470-CLB
TP5 TP6 TP-1 TP-2 TP-3 TP-4 TP-5 TP-6 TP-19 TP-AGN TP-C1 TP-C2 TP-SW1 TP-VPROG1 TP-VSS1 TP-VSS3: "Test Point, Miniature, SMT"
TP-20: "LOW PROFILE, TH"
U1: library part BQ76PL536APAPR, "Lithium-Ion Battery Monitor and Secondary Protection IC for Electric and Hybrid, -40 to 85 degC, 64-pin HTQFP (PAP), Green (RoHS & no Sb/Br)"
U4 U6: "25 Mbps Quad Channels, 3 / 1, Digital Isolator, 3.3 V / 5 V, -40 to +125 degC, 16-pin SOIC (DW), Green (RoHS & no Sb/Br)"
U5: "Remote 8-Bit I2C and SMBus Low-Power I/O Expander with Reset and Configuration Registers, 2.3 to 5.5 V, -40 to 85 degC, 16-pin TSSOP (PW), Green (RoHS & no Sb/Br)"
U7: "Single Output LDO, 100 mA, Fixed 3.3 V Output, 2.7 to 10 V Input, with Low IQ, 5-pin SOT-23 (DBV), -40 to 125 degC, Green (RoHS & no Sb/Br)"
U8: "LOW POWER CURRENT MODE PUSH-PULL PWM, D0008A"
U9: "Ultralow-Power 100-mA Low-Dropout Linear Regulators, DBV0005A"
Z1: "Diode, TVS, Bi, 36 V, 400 W, SMA"
Z2 Z3 Z4 Z5 Z6 Z7 Z8 Z9 Z10 Z11 Z12 Z13: "Diode, Zener, 5.6 V, 500 mW, SOD-123"

## Via types
v1: diameter 24, hole 12, Top Layer to Bottom Layer, tented both sides, 269 vias
v2: diameter 19.68, hole 7.87, Top Layer to Bottom Layer, 25 vias
v3: diameter 20, hole 12, Top Layer to Bottom Layer, tented both sides, 1 vias

## Nets (pads, with @x,y where several pads share a name; then routed paths per layer and width w, separated by ;. In a path a pad name is that pad's centre, name@x,y a point inside that pad or via, vN(x,y) a via of type N, cw(c..) or ccw(c..) an arc to the next point about the centre after c; other vN are vias at no path point)
1-ALERT: P7.4 R189.1 U1.38 | length 2310.1
  Top Layer w8: U1.38@2578.35,1230.79 2638.9,1230.79 2671.68,1198 2998,1198 3069.97,1269.97 3069.97,1403.6 3089.4,1423.03 v1(3089.4,1602.6) 3089.4,2096.32 3188.08,2195 3365,2195 3485,2315 3580.36,2315 3642.76,2252.6 3642.76,2249.24 3667,2225 R189.1@3690,2225
  Bottom Layer w8: v1(3089.4,1602.6) 3232.6,1602.6 P7.4@3280,1650
1-ALERT_N: C2.2 C37.1 P4.1 R4.1 U1.57 | length 2317.9
  Top Layer w8: R4.1@2280,3169.25 v1(2280,3225) 2280,3437.75 P4.1@2295,3452.75 ; C37.1@2575,1829.32 C37.1@2575,1830
  Top Layer w10: C2.2@2225,2653.5 v1(2225,2650.55) 2225,2530 2365,2390 2365,1805 2365,1583.84 2342.94,1561.78 2342.94,1508.17 U1.57@2340.16,1505.39
  Bottom Layer w10: v1(2225,2650.55) 2225,2815 2280,2870 v1(2280,3225) ; v1(2375,1805) 2553.5,1805 v1(2578.5,1830)
1-ALERT_S: R55.2 R59.2 U1.23 | length 1144.9
  Top Layer w8: R55.2@2053,531.57 2055,533.57 v1(2055,578) ; U1.23@2320.47,1051.65 2320.47,1015.22 2405,930.69 v1(2405,510) R59.2@2405,475
  Bottom Layer w12: v1(2055,578) 2055,507 2132,430 2325,430 v1(2405,510)
1-CB1: R111.1 U1.12 | length 1316.4
  Top Layer w8: R111.1@1601.5,200 1601.72,200.22 v1(1672.75,200.22) ; v1@2022,1193 2036,1193 2054.1,1211.1 U1.12@2124.61,1211.1
  Bottom Layer w8: v1(1672.75,200.22) 1799.55,327.01 1799.55,897.05 2001.53,1099.03 2001.53,1171.96 v1@2020.61,1191.04
  other v1: 2020.96,1190.97
1-CB2: R102.1 U1.10 | length 1009
  Top Layer w8: R102.1@1601.5,575 v1@1664.93,575 ; v1@1979,1238 v1(1982.96,1237.97) 1998,1238 2010.47,1250.47 U1.10@2124.61,1250.47
  Bottom Layer w8: v1@1664.91,575.01 1721,631.1 1721,906.02 1982.96,1167.98 v1(1982.96,1237.97)
  other v1: 1664.96,574.97
1-CB3: R95.1 U1.8 | length 725
  Top Layer w8: R95.1@1601.5,925 1602.33,925.83 v1(1654.07,925.83) ; v1@1987,1308 1998,1308 2016.16,1289.84 U1.8@2124.61,1289.84
  Bottom Layer w8: v1(1654.07,925.83) 1679.49,951.25 1679.49,1020.91 1871.81,1213.24 1889.08,1213.24 v1@1982.46,1306.62
  other v1: 1984.96,1306.97
1-CB4: R87.1 U1.6 | length 618.8
  Top Layer w8: R87.1@1601.5,1275 1606.96,1280.46 v1(1606.96,1338.97) ; v1@1988,1377.31 2036.1,1329.21 U1.6@2124.61,1329.21
  Bottom Layer w8: v1@1606.55,1339.16 1606.66,1339.27 1644.36,1376.97 v1(1986.96,1376.97)
1-CB5: R76.1 U1.4 | length 628.8
  Top Layer w8: R76.1@1601.5,1625 v1@1648.93,1625 ; v1(1987.96,1446.97) 2066.42,1368.58 U1.4@2124.61,1368.58
  Bottom Layer w8: v1@1649.41,1624.83 1810.1,1624.83 v1(1987.96,1446.97)
  other v1: 1648.96,1624.97
1-CB6: R69.1 U1.2 | length 868.8
  Top Layer w8: R69.1@1601.5,2000 1603.53,1997.97 v1(1662.96,1997.97) ; v1@2032.65,1515.22 2032.65,1453.35 2078.05,1407.95 U1.2@2124.61,1407.95
  Bottom Layer w8: v1@1663.97,1998.87 1693.86,1968.98 1693.86,1854.07 v1(2030.96,1516.97)
1-CELL0: C4.2 C6.2 C7.2 C8.2 C9.2 C10.2 C11.2 C12.2 C13.2 C14.2 C16.2 C18.2 C21.2 C26.2 C29.2 C31.2 C32.2 C39.2 C40.2 C41.2 C42.2 C43.2 C44.2 C45.2 C46.2 C47.2 C120.2 C123.2 C130.2 C131.2 C132.2 C135.2 C137.2 D5.2 D6.2 JP18.1 P1.7 P7.2 P7.10 P8.5 P8.6 Q2.4 Q2.7 Q5.4 Q5.7 Q8.4 Q8.7 R53.1 R53.2 R57.1 R58.1 R59.1 R60.1 R61.1 R62.1 R63.1 R64.1 R75.1 R80.2 R82.2 R83.2 R96.1 R101.2 R103.1 R104.1 R105.1 R108.2 R112.1 R202.1 R213.1 TP6.1 TP-VSS1.1 TP-VSS3.1 U1.13 U1.14 U1.15 U1.25 U1.33 U1.34 U1.35 U1.49 U1.50 U1.65 U4.2 U4.8 U6.9 U6.15 U9.2 U9.3 Z1.1 Z12.2 Z13.2 | length 8199.5
  Top Layer w8: v1(1890.07,626.39) 1926,626.39 C10.2@1926,626 ; U1.15@2124.61,1152.05 2071.95,1152.05 v1(2066,1158) 2079.73,1171.73 U1.14@2124.61,1171.73 ; v1(2254.61,370.07) R57.1@2254.61,406 ; v1(2329.61,370.07) R58.1@2329.61,406 ; v1(2406.61,369.07) R59.1@2406.61,405 ; U1.50@2477.95,1505.39 2477.95,1545.95 2488,1556 v1(2513,1556) 2497.64,1540.64 U1.49@2497.64,1505.39 ; v1(2480.61,369.07) R60.1@2480.61,405 ; v1(2554.61,369.07) R61.1@2554.61,405 ; U1.33@2575.39,1132.36 v1@2624.64,1132.36 ; U1.34@2575.39,1152.05 2623.95,1152.05 2624.64,1151.36 ; U1.35@2575.39,1171.73 2614.27,1171.73 2626,1160 v1(2626,1131) ; v1(2630.61,369.07) R62.1@2630.61,405 ; v1(2704.61,368.07) R63.1@2704.61,404 ; v1(2779.61,368.07) R64.1@2779.61,404 ; R83.2@3190,2090 v1(3190,2132.48) ; v1(3194.93,986.71) 3194.93,1025 R80.2@3195,1025 ; v1(3269.93,986.71) 3269.93,1025 R82.2@3270,1025
  Top Layer w10: C4.2@2050,2653.5 2050,2575 2315,2310 v1(2315,2045) ; U1.25@2359.84,1054.61 2359.84,1108.84 v1(2360,1109)
  Top Layer w12: v1(3714.8,1625.2) 3714.9,1625.1 U6.15@3785.4,1625.1 ; v1(3714.8,1925.2) 3714.9,1925.1 U6.9@3785.4,1925.1 ; v1(3865,2050) 3865.1,2049.9 U4.8@3935.6,2049.9
  Top Layer w20: v1(1658,1350) C21.2@1698.5,1350 C21.2@1700.5,1350 ; v1(1658,1429) 1698.5,1429 C18.2@1700.5,1429 ; v1(1658,1510) C14.2@1698.5,1510 C14.2@1700.5,1510 ; v1(1659,1191) 1698.5,1191 C29.2@1701.5,1191 ; v1(1659,1269) 1698.5,1269 C26.2@1701.5,1269 ; v1(1802.52,1110) C40.2@1848.5,1110 ; Z1.1@1820,1898.74 v1(1820,1964) v1(1820,1996) ; C39.2@2003,842.57 C39.2@2005,844.57 ; C16.2@2060,1751.5 v1(2060,1797) ; C41.2@2180,1704.43 v1(2180,1757) ; v1(2208,835) C44.2@2208,883.5 ; v1(2697,1049) 2737.5,1049 R96.1@2738.5,1050 ; C46.2@2821.5,1308 2823.5,1310 v1(2870,1310) ; R75.1@3256.5,940 v1(3309,940) ; C120.2@3475,2156.5 v1(3475,2202) ; R202.1@3518.5,2250 3521,2252.5 v1(3521,2291) ; C130.2@3526,1056.5 3527,1057.5 v1(3527,1108) ; v1(3570,1575) C123.2@3618.5,1575 ; C132.2@3650,830.5 3651,831.5 v1(3651,886) ; C131.2@3750,831.5 3751,832.5 v1(3751,886) ; R213.1@3775,1018.5 3776,1017.5 v1(3776,965)
  Top Layer w24: C45.2@2115,850 2115.21,850 v1(2115.21,790.72) ; v1(2552,764) v1(2552,807) 2552,855 C43.2@2552,858 ; C11.2@2686.31,585.97 2691.5,585.97 v1(2734.74,585.97) ; C12.2@2687.31,659.97 C12.2@2691.5,660 v1(2735.74,659.97) ; C13.2@2688.31,736.97 2691.5,736.97 v1(2736.74,736.97) ; R105.1@2758,2079.97 v1(2806.43,2079.97) ; R105.1@2758,2080 R105.1@2758,2081 ; R103.1@2759,1923.2 2759,1922.17 v1(2807.43,1922.17) ; R104.1@2760,2000 2760,1998.97 v1(2808.43,1998.97) ; C47.2@2820,1390 2820,1389.76 v1(2866.76,1389.76) v1@2866.76,1390.04 ; R108.2@2842,1557 2842,1555.97 2843.76,1557.73 2851.03,1565 v1(2895,1565) ; R101.2@2842,1632 2842,1630.97 2846.5,1630.97 v1(2890.43,1630.97) ; C31.2@2843,1482 2843,1480.97 2846.5,1480.97 v1(2891.43,1480.97) ; C32.2@2844,1707 2844,1705.97 2846.5,1705.97 v1(2892.43,1705.97) ; v1(3590,345) D5.2@3642.5,345 ; v1(3595,550) D6.2@3642.5,550 ; U9.2@3650,1005 U9.2@3650,995.87 3650,960 v1(3670,940) 3685,955 3687,955 3687,995.87 U9.3@3687,1005 ; v1(3685,2400) C135.2@3735,2400 ; v1(3860,2350) 3860.1,2349.9 U4.2@3935.6,2349.9
  Top Layer w48: P1.7@200,1038.22 250.23,988 329.46,988 454,988 456,988 456,896.75 450,890.75 450,790
  Bottom Layer w8: C6.2@2328.5,317.5 2328.5,368.96 v1(2329.61,370.07) ; C7.2@2513.27,327.73 v1(2554.61,369.07) ; v1(2779.61,368.07) 2779.61,317.5 2779.61,314.39 2825,269 C9.2@2825,186.5
  Bottom Layer w20: v1(1820,1996) 2084,1996 2090,1990 ; v1(2060,1797) 2132,1797 2145,1810 ; v1(2180,1757) 2180,1780 2147.5,1812.5 ; v1(2315,2045) 2145,2045 2090,1990 ; P8.5@2495,140 P8.6@2495,240 2495,289 C7.2@2523.5,317.5 ; v1(2513,1556) 2513,1443 v2(2452.36,1382.36) v2(2401.18,1382.36) v2(2350,1382.36) v2(2298.82,1382.36) v2(2247.64,1382.36) 2145,1485 2145,1810 ; 2090,1990 2090,1870 2147.5,1812.5 ; 2145,1810 2147.5,1812.5
  Bottom Layer w48: JP18.1@456,990 456,904.32 570,790.32 570,315 785,100 896,100 v1(939,100) v1(980,100) ; v1(1490,89) 1490,132.25 1490,219 1515,244 1515,329.82 v1(1515,373)
  other v1: 400,100 600,100 1850,100 2050,100 2900,100 3100,100 3300,100 896,101 3570,110 3625,110 1489.84,132.25 3542.5,150 3595,150 3647.5,150 3350,250 1515.19,329.82 1650,350 100,450 3350,450 100,650 1650,700 3010,780 2702.1,784.6 311,791 351,791 2002.52,793 310,832 351,832 2613.5,848.6 100,850 1650,1000 100,1050 3140,1050 100,1250 100,1450 100,1650 1650,1800 100,1850 1717,1996 100,2050 3280.82,2111.15
  other v2: 2247.64,1177.64 2298.82,1177.64 2350,1177.64 2401.18,1177.64 2452.36,1177.64 2247.64,1228.82 2298.82,1228.82 2350,1228.82 2401.18,1228.82 2452.36,1228.82 2247.64,1280 2298.82,1280 2350,1280 2401.18,1280 2452.36,1280 2247.64,1331.18 2298.82,1331.18 2350,1331.18 2401.18,1331.18 2452.36,1331.18
1-CELL1: C34.2 C42.1 JP17.1 P1.6 Q7.4 Q7.7 R52.2 R107.1 R109.1 R110.2 Z10.2 Z11.2 Z12.1 | length 2632.2
  Top Layer w24: JP17.1@456,1140 456,1094 475.34,1074.66 805.63,1074.66 826.99,1053.3 826.99,1014.97 801.51,989.49 801,990 R52.2@770,990 ; R110.2@995,300 995,210 1020,185 1246.45,185 1259.94,171.51 1259.94,142.51 1240.14,122.71 1195.47,122.71 1189.5,122.71 Z12.1@1189.5,125
  Bottom Layer w48: P1.6@200,1176.02 313.89,1176.02 349.91,1140 JP17.1@454,1140 456,1140 531,1065 568.68,1065 660,973.68 660,608.43 848.43,420 v1(905,420) v1(950,420) v1(995,420) ; v1(1490,470) 1490,517.34 1490,593 1520,623 1520,702.84 v1(1520.82,702.84) 1520,706 v1(1520,746)
  other v1: 1490.24,517.34
1-CELL2: C28.2 C34.1 JP16.1 P1.5 Q6.4 Q6.7 R51.2 R97.1 R98.1 R100.2 Z8.2 Z9.2 Z10.1 | length 2434.2
  Top Layer w24: JP16.1@456,1290 456,1244 475.34,1224.66 805.63,1224.66 826.99,1203.3 826.99,1164.97 801.51,1139.49 801,1140 R51.2@770,1140 ; R100.2@995,650 995,555 1010,540 1241.45,540 1256.21,525.24 1256.21,485.78 1245.43,475 1195.47,475 Z10.1@1189.5,475
  Bottom Layer w48: P1.5@200,1313.81 313.89,1313.82 337.71,1290 JP16.1@454,1290 456,1290 531,1215 568.68,1215 765,1018.68 765,848.43 843.43,770 v1(900,770) v1(950,770) v1(1000,770) ; v1(1485.15,820.54) 1485,824 1485,864 1485,987 1520,1022 1520,1053.48 v1(1519.89,1053.48) 1520,1056 v1(1520,1096)
  other v1: 1484,864
1-CELL3: C25.2 C28.1 JP15.1 P1.4 Q4.4 Q4.7 R50.2 R90.1 R92.1 R93.2 Z6.2 Z7.2 Z8.1 | length 2257.2
  Top Layer w24: JP15.1@456,1440 456,1394 475.34,1374.66 805.63,1374.66 826.99,1353.3 826.99,1314.97 801.51,1289.49 801,1290 R50.2@770,1290 ; R93.2@995,1000 995,905 1010,890 1241.45,890 1254.55,876.9 1254.55,841.55 1238,825 1195.47,825 Z8.1@1189.5,825
  Bottom Layer w48: P1.4@200,1451.61 313.89,1451.61 325.5,1440 JP15.1@454,1440 456,1440 531,1365 647.44,1365 897.44,1115 v1(920,1115) v1(975,1115) v1(1020,1115) ; v1(1490,1177) 1490,1219.45 1490,1298 1520,1328 1520,1405.14 v1(1520,1449)
  other v1: 1489.5,1219.45 1520.15,1405.14
1-CELL4: C20.2 C25.1 JP14.1 P1.3 Q3.4 Q3.7 R49.2 R78.1 R79.1 R81.2 Z4.2 Z5.2 Z6.1 | length 2266.3
  Top Layer w24: JP14.1@456,1590 456,1544 475.34,1524.66 805.63,1524.66 826.99,1503.3 826.99,1464.97 801.51,1439.49 801,1440 R49.2@770,1440 ; R81.2@995,1350 995,1255 1010,1240 1241.45,1240 1258.28,1223.17 1258.28,1195.28 1238,1175 1195.47,1175 Z6.1@1189.5,1175
  Bottom Layer w48: P1.3@200,1589.41 331.6,1589.41 332.19,1590 JP14.1@454,1590 456,1590 521,1655 770,1655 883,1542 883,1487.19 905.19,1465 v1(920,1465) v1(970,1465) v1(1020,1465) ; v1(1485,1521) 1485,1564.58 1485,1641 1525,1681 1525,1753.17 v1(1524.74,1753.17) 1525,1756 v1(1525,1796)
  other v1: 1484.41,1564.58
1-CELL5: C17.2 C20.1 JP13.1 P1.2 Q1.4 Q1.7 R48.2 R71.1 R72.1 R74.2 Z2.2 Z3.2 Z4.1 | length 2161.2
  Top Layer w24: JP13.1@456,1740 456,1694 475.34,1674.66 805.63,1674.66 826.99,1653.3 826.99,1614.97 801.51,1589.49 801,1590 R48.2@770,1590 ; R74.2@995,1700 995,1610 1005,1600 1231.45,1600 1251.65,1579.8 1251.65,1555.16 1231.35,1534.86 Z4.1@1199.36,1534.86
  Bottom Layer w48: P1.2@200,1727.2 331.6,1727.2 344.4,1740 JP13.1@454,1740 456,1740 518,1802 640.34,1802 668.34,1830 v1(930,1830) v1(985,1830) v1(1035,1830) ; v1(1485.26,1885.34) 1485,1890 1485,1931 1485,2036 1525,2076 1525,2124.9 v1(1525,2168)
  other v1: 1486,1931 1524.45,2124.9
1-CELL6: C17.1 J1.1 P1.1 R47.2 R66.2 R67.2 TP5.1 TP-C1.1 Z2.1 | length 2722.9
  Top Layer w24: J1.1@453,1935 453,1943 525,2015 TP5.1@525,2075 ; J1.1@455,1935 585.48,1804.52 750,1804.52 768.09,1786.43 768.09,1740 R47.2@770,1740 ; R66.2@995,2075 995,1994 1022.75,1966.25 1222.57,1966.25 1248.03,1940.78 1248.03,1921.31 1236.02,1909.3 Z2.1@1198.8,1909.3
  Top Layer w25: R66.2@995,2075 995,2156.5 1058.5,2220 1560,2220 1615,2165 1617,2165 1628.5,2153.5 1688.52,2093.48 R67.2@1688.52,2056.75
  Top Layer w40: P1.1@200,1865 P1.1@205,1870
  Bottom Layer w48: P1.1@200,1865 385,1865 454,1934 585,2065 v1(880,2065) 900,2065 v1(920,2065)
  other v1: 900,2030
1-CONV: P7.1 R83.1 R194.1 U1.36 | length 1977.4
  Top Layer w8: U1.36@2578.35,1191.42 2625.37,1191.42 2650.79,1166 3016,1166 3101.97,1251.97 3101.97,1382.55 3131.7,1412.28 3131.7,1664.63 3180,1712.93 P7.1@3180,1750 3180,1888.75 3190,1898.75 3190,2020 3305,2020 3382.18,1942.82 3585.82,1942.82 3690,2047 R194.1@3690,2075
1-CONV_N: R1.1 R2.1 U1.59 | length 1965.2
  Top Layer w8: R1.1@2031,3193.84 2095.41,3193.84 R2.1@2120,3169.25 2077.42,3126.66 2077.42,3049.93 1985,2957.51 1985,2580 2270,2295 2270,2011.16 2323,1958.16 2323,1705.62 2300.79,1683.41 U1.59@2300.79,1508.35
1-CONV_S: C6.1 C10.1 P8.4 R57.2 U1.21 | length 1419.7
  Top Layer w8: C10.1@1993.5,626 1999,626 2021,604 2206,604 2224,586 2224,535 2239,520 2255,520 ; R57.2@2255,475 2255,520 ; U1.21@2281.1,1051.65 2281.1,997.99 2354,925.1 2354,619 2305,570 2275,570 2255,550 2255,520 ; P8.4@2395,240 2395,250 2290,355 2290,497 2267,520 2255,520
  Bottom Layer w24: P8.4@2391.5,243.5 C6.1@2391.5,317.5
1-CS_N: R9.1 R12.1 R105.2 U1.52 | length 2757.8
  Top Layer w8: U1.52@2438.58,1508.35 2438.58,1541 2510.12,1612.54 2510.12,1966.02 2550,2005.91 2550,2105 2607.5,2105 2632.5,2080 R105.2@2685,2080
  Top Layer w10: 2550,2105 2710,2265 2710,2990 2784.39,3064.39 2894.39,3064.39 2920,3090 2987.91,3090 R12.1@3055,3157.09 ; R9.1@2560,3171.5 2560,3220 2600,3260 2956.93,3260 R12.1@3057.42,3159.51
1-CS_S: C7.1 C13.1 P8.8 R64.2 U1.29 | length 1422.1
  Top Layer w8: U1.29@2438.58,1051.65 2438.58,1020.36 2507,951.94 2507,767 2539,735 2625,735 2625,707 2636.31,695.69 2735.74,695.69 2780.58,650.85 2780.58,580 2780,579.42 v1(2780,510) ; P8.8@2595,240 2640,195 2712.93,195 2815,297.07 2815,505 2810,510 v1(2780,510) ; R64.2@2780,475 v1(2780,510)
  Bottom Layer w24: P8.8@2586.5,248.5 C7.1@2586.5,317.5
1-DRDY: P7.6 R196.1 U1.37 | length 2096.6
  Top Layer w8: U1.37@2578.35,1211.1 2632.42,1211.1 2661.53,1182 3007,1182 3085.97,1260.97 3085.97,1391.82 3111.7,1417.55 v3(3111.7,1516.9) 3111.7,2096.03 3189.02,2173.35 3311.66,2173.35 3485.01,2000 R196.1@3515,2000
  Bottom Layer w8: v3(3111.7,1516.9) 3123,1505.6 3235.6,1505.6 P7.6@3280,1550
1-DRDY_N: C1.2 C38.1 P4.2 R3.1 U1.58 | length 2692.7
  Top Layer w8: C38.1@2127.17,2142.55 2127.17,2327.17 v1(2140,2340) ; C38.1@2130.67,2141.06 C38.1@2130.67,2142.55 ; R3.1@2200,3151.5 v1(2200,3240) 2200,3457.75 P4.2@2295,3552.75
  Top Layer w10: C1.2@2135,2653.5 v1(2135,2650.55) 2135,2545 2320,2360 2345,2335 2345,1620 2320.47,1595.47 U1.58@2320.47,1505.39
  Bottom Layer w8: v1(2140,2340) 2300,2340 v1(2315,2355)
  Bottom Layer w10: v1(2135,2650.55) 2135,2805 2200,2870 v1(2200,3240) v1@2200,3245